# Altium PCB HairColorDispenser.PcbDoc
Units mm, origin at the board's own origin, x right, y up, seen from the top; angles counter-clockwise.
Board outline 93 x 77 mm, 2 copper layers (Top Layer, Bottom Layer), stack 0.325 mm thick; 86 components, 76 nets, 303 pads, 70 vias.
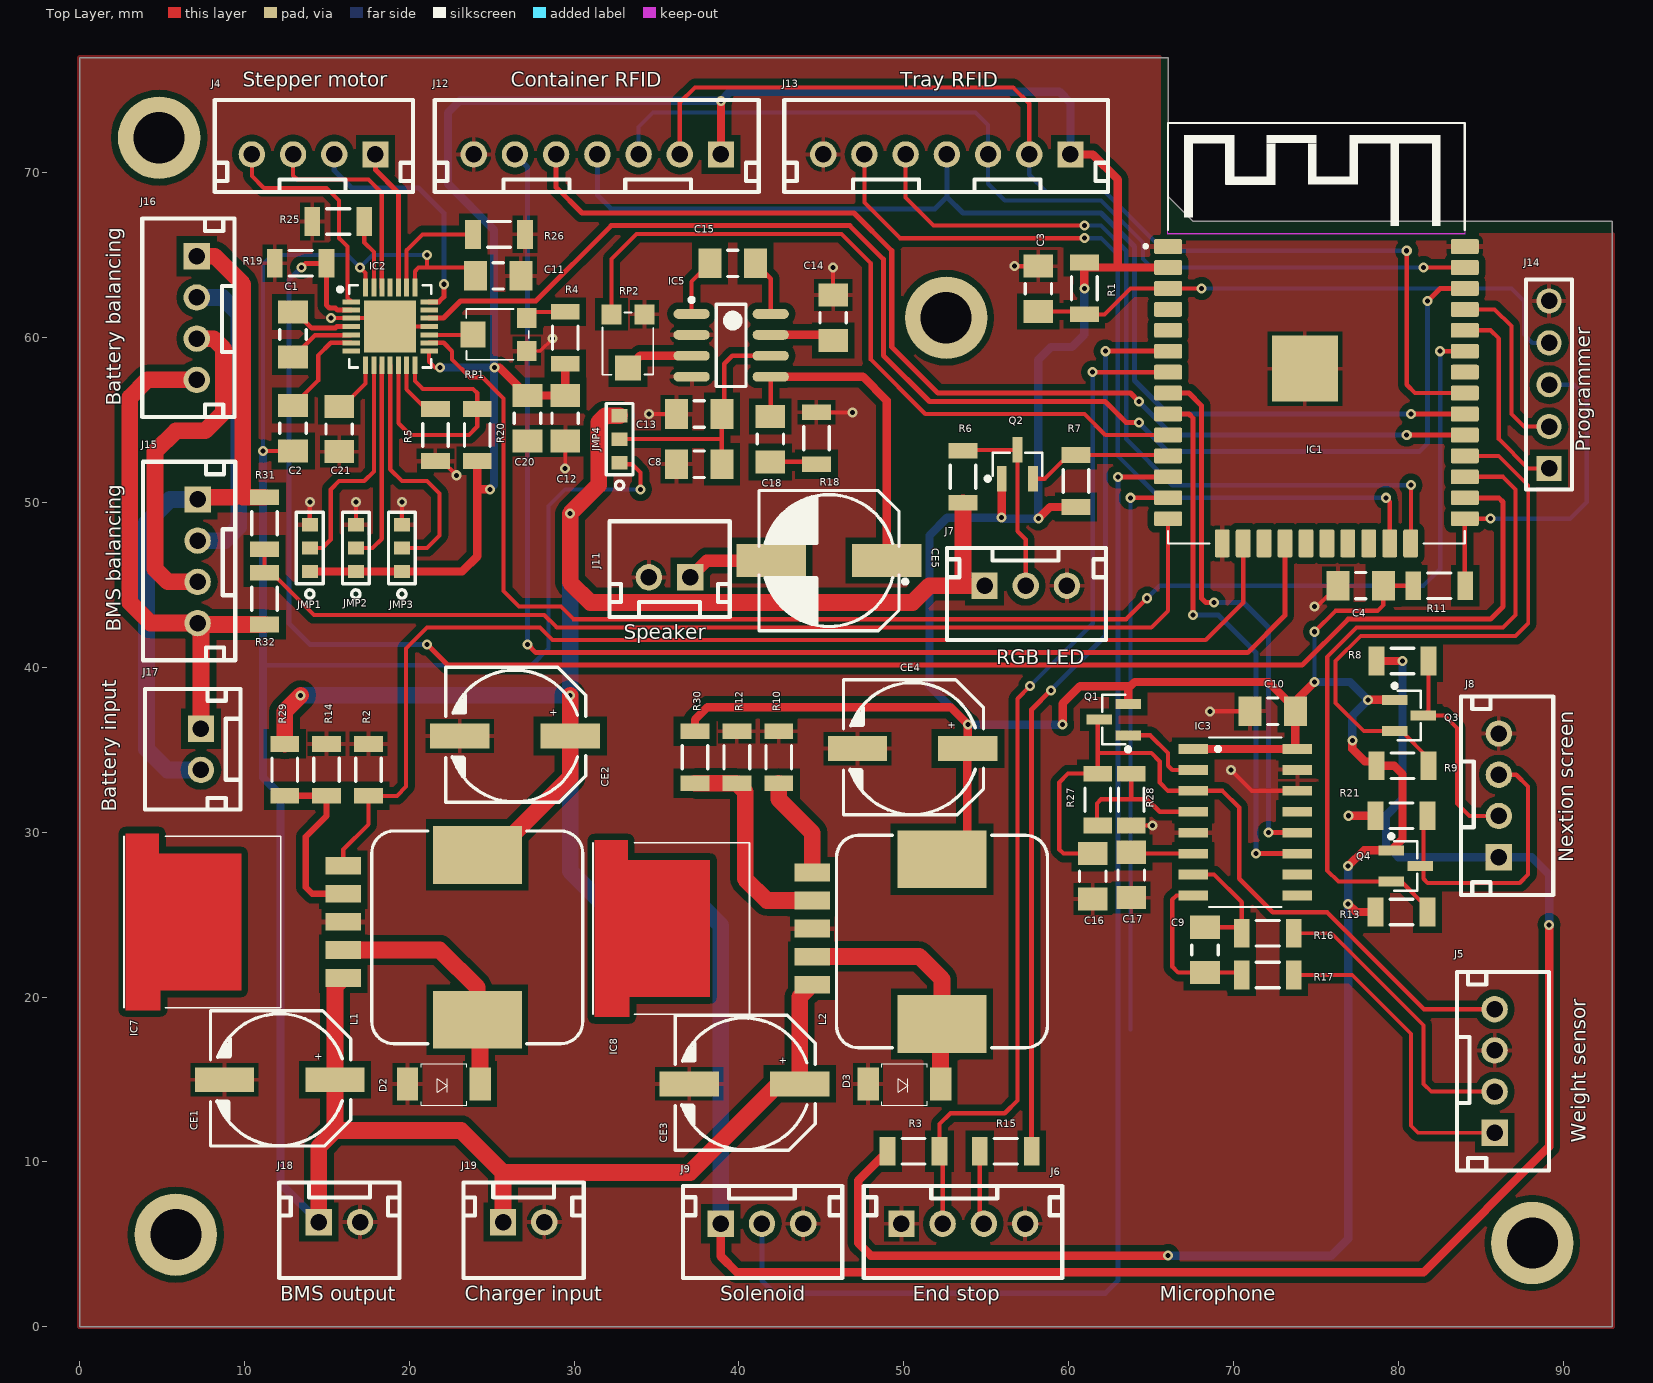
[diagram p0: Top Layer view]
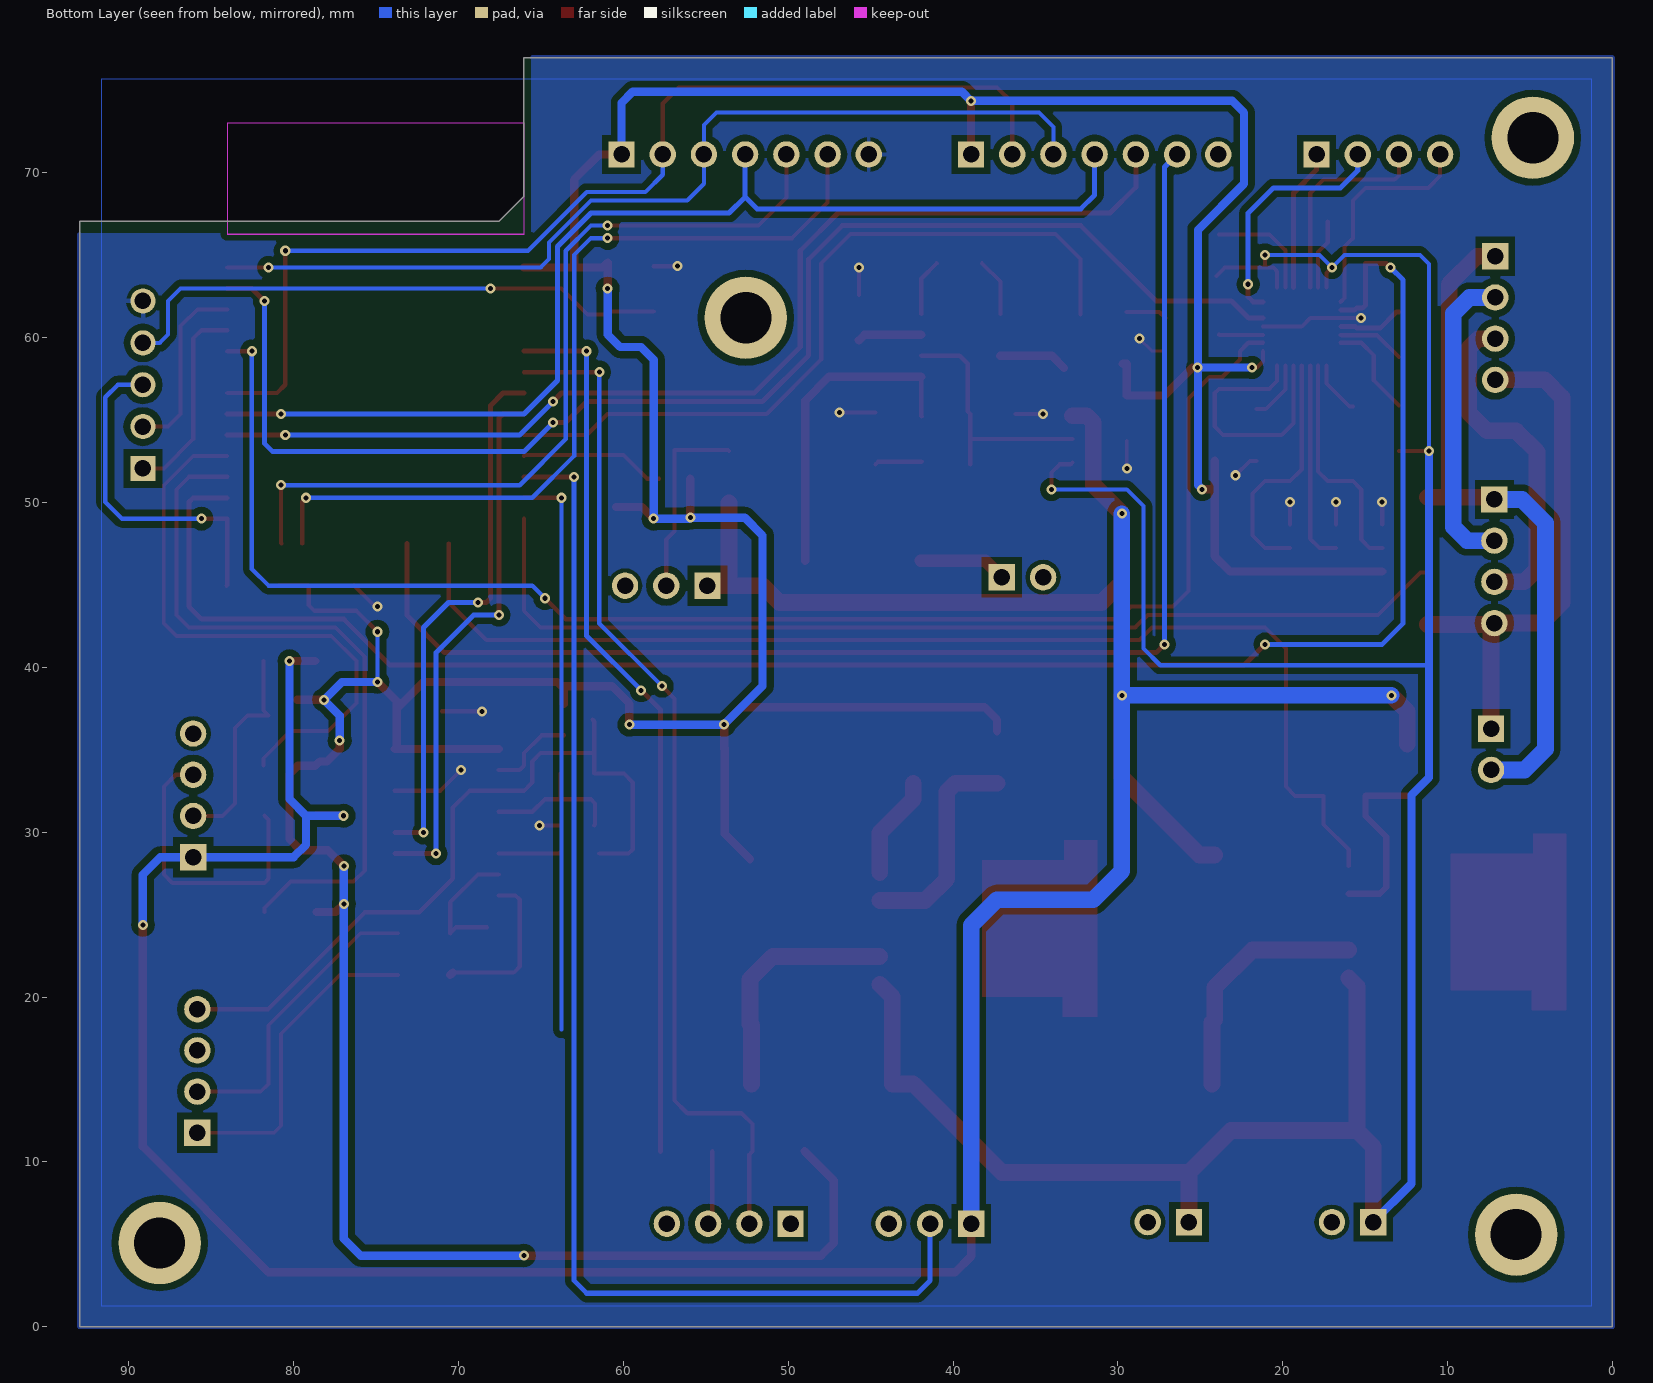
[diagram p1: Bottom Layer view, seen from below]

## Layer stack, top to bottom
Top Solder: solder mask 0.0102, Solder Resist, Dk 3.5
Top Layer: signal copper 0.0356
Dielectric 1: core 0.254, FR-4, Dk 4.2
Bottom Layer: signal copper 0.0356
Solder Side: solder mask 0.0102, Solder Resist, Dk 3.5

## Board outline
0,0 93,0 93,67.056 67.564,67.056 66.04,68.58 66.04,77 0,77

## Design rules (kind name [scope] priority, off if disabled: settings)
Clearance Clearance_1 [InComponent('IC2')] p1: gap=0.152 ignorepadtopadclearanceinfootprint=FALSE except(0: Arc-Hole Track-Hole SMDPad-Hole THPad-Hole Via-Hole Fill-Hole Poly-Hole Region-Hole Text-Hole)
Clearance "Clearance Poly" [InPoly] p2: gap=0.406 ignorepadtopadclearanceinfootprint=FALSE except(0: Arc-Hole Track-Hole SMDPad-Hole THPad-Hole Via-Hole Fill-Hole Poly-Hole Region-Hole Text-Hole)
Clearance [All] p3: gap=0.152 ignorepadtopadclearanceinfootprint=FALSE except(0: Arc-Hole Track-Hole SMDPad-Hole THPad-Hole Via-Hole Fill-Hole Poly-Hole Region-Hole Text-Hole)
DiffPairsRouting [All] p1: maxlimit=0.254 minlimit=0.254 mostfreqgap=0.254 toplayer_minwidth=0.254 toplayer_maxwidth=0.254 toplayer_prefwidth=0.254 bottomlayer_minwidth=0.254 bottomlayer_maxwidth=0.254 bottomlayer_prefwidth=0.254 maxuncoupledlength=12.7
HoleSize [All] p1: absolutevalues=TRUE maxlimit=12.7 minlimit=0.025 maxpercent=80.000 minpercent=20.000
MinimumSolderMaskSliver [All] p1: minsoldermaskwidth=0.025
PolygonConnect PolygonConnect_Via [IsVia] p1: connectstyle=Direct reliefconductorwidth=0.254 reliefentries=4 polygonreliefangle="90 Angle" airgapwidth=0.254
PolygonConnect [All] p2: connectstyle=Relief reliefconductorwidth=0.254 reliefentries=4 polygonreliefangle="90 Angle" airgapwidth=0.254
RoomDefinition HairColorDispenser [InComponentClass('HairColorDispenser')] p1: confinementstyle=ConfineIn formatcopy=TRUE lockcomponents=FALSE outline -598.755,-621.56 -547.955,-621.56 -547.955,-596.16 -598.755,-596.16
RoutingVias [All] p1: holewidth=0.254 width=0.508 viastyle="Through Hole" minholewidth=0.305 minwidth=0.61 maxholewidth=2.54 maxwidth=2.54
SilkToSilkClearance [All] p1: silktosilkclearance=0.127
SilkToSolderMaskClearance [IsPad] p1: minsilkscreentomaskgap=0.127 clearancetoexposedcopper=TRUE
SolderMaskExpansion [All] p1: expansion=0.102
Width [All] p1: maxlimit=2.032 minlimit=0.152 preferedwidth=0.254
25 further rules are at their usual default settings.

## Components (designator, comment, footprint, x,y, rotation, side; value= is the part's Value field where it differs from the comment)
C1 "100n" CAPC3216X18N 12.954,60.198 r270 top
C2 "100n" CAPC3216X18N 12.954,54.505 r270 top
C3 "100n" CAPC3216X18N 58.166,62.967 r270 top
C4 "100n" CAPC3216X18N 77.724,44.958 r0 top
C8 "100n" CAPC3216X18N 37.592,52.324 r0 top
C9 "100n" CAPC3216X18N 68.275,22.86 r90 top
C10 "100n" CAPC3216X18N 72.39,37.338 r0 top
C11 "100n" CAPC3216X18N 25.4,63.754 r180 top
C12 "100n" CAPC3216X18N 29.464,55.118 r90 top
C13 "10uF" CAPC3216X18N 37.592,55.372 r0 top
C14 "10uF" CAPC3216X18N 45.72,61.214 r270 top
C15 "10uF" CAPC3216X18N 39.624,64.516 r0 top
C16 "1uF" CAPC3216X18N 61.468,27.327 r90 top
C17 "1uF" CAPC3216X18N 63.804,27.41 r90 top
C18 "10p" CAPC3216X18N 41.91,53.848 r270 top
C20 "2u2" CAPC3216X18N 27.178,55.118 r90 top
C21 "220n" CAPC3216X18N 15.748,54.461 r90 top
CE1 "220uF" "220uF 35V" 12.144,14.961 r0 top
CE2 "220uF" "220uF 35V" 26.416,35.814 r0 top
CE3 "220uF" "220uF 35V" 40.338,14.707 r0 top
CE4 "220uF" "220uF 35V" 50.546,35.052 r0 top
CE5 "100u 25V" CAPAE800X550N 45.466,46.482 r180 top
D2 "1N5824" SOD128 22.098,14.732 r180 top
D3 "1N5824" SOD128 50.038,14.732 r180 top
IC1 "ESP32-WROOM-32" MODULE_ESP-WROOM-32 75.04,57.277 r0 top
IC2 "A4988" "28-QFN (5x5)" 18.846,60.684 r0 top
IC3 "HX711" SOP16 70.719,30.988 r0 top
IC5 "LM386" SOIC-8 39.534,59.541 r0 top
IC7 "LM2596 Adj" TO263-5 16.002,21.16 r90 top
IC8 "LM2596 Adj" TO263-5 44.447,20.756 r90 top
J4 "Stepper motor" B4B-HX-A 17.954,71.12 r180 top
J5 "Weight Sensor" B4B-HX-A 85.852,11.764 r90 top
J6 "QRD1114" B4B-HX-A 49.864,6.252 r0 top
J7 "WS2812B" B3B-HX-A 54.904,44.958 r0 top
J8 "Nextion" B4B-HX-A 86.106,28.488 r90 top
J9 "WS2812B" B3B-HX-A 38.902,6.252 r0 top
J11 "Speaker" B2B-XH-A 37.044,45.466 r180 top
J12 "RFID Container" B7B-HX-A 38.916,71.12 r180 top
J13 "RFID Tray" B7B-HX-A 60.118,71.12 r180 top
J14 "Programmer" HEADER1X5 89.154,55.88 r90 top
J15 "Balancing BMS" B4B-HX-A 7.162,50.19 r270 top
J16 "Balancing Battery" B4B-HX-A 7.112,64.944 r270 top
J17 "Battery Input" B2B-XH-A 7.366,36.282 r270 top
J18 "BMS Output" B2B-XH-A 14.518,6.35 r0 top
J19 "Charger Input" B2B-XH-A 25.694,6.35 r0 top
JMP1 "0R" JMP_SOLDER_3 13.97,47.244 r90 top
JMP2 "0R" JMP_SOLDER_3 16.764,47.244 r90 top
JMP3 "0R" JMP_SOLDER_3 19.558,47.244 r90 top
JMP4 "0R" JMP_SOLDER_3 32.766,53.848 r90 top
L1 "33uH 3A" "33uH 3A" 24.13,23.622 r90 top
L2 "33uH 3A" "33uH 3A" 52.324,23.368 r90 top
Q1 "MMBT4403" SOT95P230X126-3N 62.738,36.83 r180 top
Q2 "2N7002" SOT95P230X126-3N 56.896,52.324 r90 top
Q3 "2N7002" SOT95P230X126-3N 80.659,37.084 r0 top
Q4 "2N7002" SOT95P230X126-3N 80.456,27.953 r0 top
R1 "10K" "SMD 1206" 60.96,62.992 r90 top
R2 "10K" "SMD 1206" 17.526,33.782 r270 top
R3 "10K" "SMD 1206" 50.596,10.646 r180 top
R4 "10K" "SMD 1206" 29.464,59.995 r270 top
R5 "10K" "SMD 1206" 21.59,54.102 r90 top
R6 "10K" "SMD 1206" 53.594,51.562 r90 top
R7 "10K" "SMD 1206" 60.452,51.308 r270 top
R8 "10K" "SMD 1206" 80.264,40.386 r0 top
R9 "10K" "SMD 1206" 80.264,34.036 r180 top
R10 "10K" "SMD 1206" 42.418,34.544 r270 top
R11 "10K" "SMD 1206" 82.499,44.958 r0 top
R12 "1K" "SMD 1206" 39.878,34.544 r270 top
R13 "10K" "SMD 1206" 80.202,25.159 r180 top
R14 "1K" "SMD 1206" 14.986,33.782 r270 top
R15 "100R" "SMD 1206" 56.184,10.646 r180 top
R16 "100R" "SMD 1206" 72.085,23.876 r180 top
R17 "100R" "SMD 1206" 72.085,21.336 r180 top
R18 "100R" "SMD 1206" 44.704,53.899 r90 top
R19 "100K" "SMD 1206" 13.411,64.516 r180 top
R20 "100K" "SMD 1206" 24.13,54.102 r270 top
R21 "10K" "SMD 1206" 80.202,31.001 r0 top
R25 "0R05" "SMD 1206" 15.697,67.056 r180 top
R26 "0R05" "SMD 1206" 25.45,66.272 r0 top
R27 "20K" "SMD 1206" 61.772,31.982 r270 top
R28 "8.2K" "SMD 1206" 63.804,31.982 r90 top
R29 "3.09K" "SMD 1206" 12.446,33.782 r270 top
R30 "1.69K" "SMD 1206" 37.338,34.544 r270 top
R31 "33K" "SMD 1206" 11.226,48.746 r90 top
R32 "10K" "SMD 1206" 11.226,44.174 r90 top
RP1 "10K" "SMD POT" 27.126,59.198 r90 top
RP2 "10K" "SMD POT" 34.274,61.416 r180 top

## Footprints (in the part's own frame and the unit in brackets; to place one, negate y for a bottom-side part, rotate by r counter-clockwise, add the part's x,y. Pads: shape width x height; smd on the part's side, far side on the other; paste and mask are expansions set on the pad)
"28-QFN (5x5)" [mil] "28-VFQFN Exposed Pad (5x5)"
  rect 42x12 smd: 1(-93,59) 2(-93,39) 3(-93,20) 4(-93,0) 5(-93,-20) 6(-93,-39) 7(-93,-59) 15(93,-59) 16(93,-39) 17(93,-20) 18(93,0) 19(93,20) 20(93,39) 21(93,59)
  rect 12x42 smd: 8(-59,-93) 9(-39,-93) 10(-20,-93) 11(0,-93) 12(20,-93) 13(39,-93) 14(59,-93) 22(59,93) 23(39,93) 24(20,93) 25(0,93) 26(-20,93) 27(-39,93) 28(-59,93)
  rect 124x124 smd: 29(0,0)
  silkscreen extent -124,-98 98,98, body extent -98,-98 98,98, height 39
"33uH 3A" [mm] "Precision Wire Wound Inductor, 2-Leads, Body 12.5x12.5mm, IPC Low Density"
  rect 3.5x5.4 smd: 1(-5,0) 2(5,0)
  silkscreen extent -6.45,-6.4 6.45,6.4, body extent -6.25,-6.25 6.25,6.25, height 7.5
"220uF 35V" [mm] "Molded Capacitor, 2-Leads, Body 8x10mm, IPC Medium Density"
  rect 3.6x1.5 smd: 1(3.35,0.025) 2(-3.35,0.025)
  silkscreen extent -4.2,-4 4.3,4.2, body extent -4,-3.97 4,4.03, height 10
B2B-XH-A [mm]
  rect 1.6x1.6 hole 1: 1(0,0)
  round 1.6 hole 1: 2(2.5,0)
  silkscreen extent -2.4,-3.4 4.9,2.4, body extent -2.45,-3.38 4.95,2.37, height 7
B3B-HX-A [mm] "HEADER, TOP ENTRY, 3WAY, 2MM"
  rect 1.6x1.6 hole 1: 1(0,0)
  round 1.6 hole 1: 2(2.5,0) 3(5,0)
  silkscreen extent -2.29,-3.3 7.37,2.29, body extent -2.41,-3.38 7.49,2.37, height 7
B4B-HX-A [mm] "HEADER, TOP ENTRY, 4WAY, 2MM"
  rect 1.6x1.6 hole 1: 1(0,0)
  round 1.6 hole 1: 2(2.5,0) 3(5,0) 4(7.5,0)
  silkscreen extent -2.29,-3.3 9.75,2.29, body extent -2.44,-3.31 9.96,2.44, height 7
B7B-HX-A [mm] "HEADER, TOP ENTRY, 4WAY, 2MM"
  rect 1.6x1.6 hole 1: 1(0,0)
  round 1.6 hole 1: 2(2.5,0) 3(5,0) 4(7.5,0) 5(10,0) 6(12.5,0) 7(15,0)
  silkscreen extent -2.29,-3.3 17.37,2.29, body extent -2.4,-3.4 17.49,2.37, height 7
CAPAE800X550N [mm] "Molded Capacitor, 2-Leads, Body 8.3x8.3mm, IPC Medium Density"
  rect 4.2x2 smd: 1(-3.5,0) 2(3.5,0)
  silkscreen extent -4.75,-4.25 4.25,4.25, body extent -4.02,-3.99 3.98,4.01, height 5.5
CAPC3216X18N [mm] "Chip Capacitor, 2-Leads, Body 3.20x1.60mm, IPC Medium Density"
  rect 1.4x1.8 smd: 1(-1.375,0) 2(1.375,0)
  silkscreen extent -0.3,-0.8 0.3,0.8, body extent -1.68,-0.87 1.67,0.87, height 1.8
HEADER1X5 [mil]
  rect 60x60 hole 39.37: 1(-150,0)
  round 60 hole 39.37: 2(-50,0) 3(50,0) 4(150,0) 5(250,0)
  silkscreen extent -200,-55 302,55, body extent -200,-50 300,50, height 286
JMP_SOLDER_3 [mil] "3 X 0603"
  rect 32x38 smd: 1(-56,0) 2(0,0)
  rect 32x38 smd paste+0 mask+0: 3(56,0)
  silkscreen extent -120,-32 85,32, body extent -72,-19 16,19, height 24
MODULE_ESP-WROOM-32 [mm]
  rrect22% 1.7x0.9 smd: 1(-9,8.255) 2(-9,6.985) 3(-9,5.715) 4(-9,4.445) 5(-9,3.175) 6(-9,1.905) 7(-9,0.635) 8(-9,-0.635) 9(-9,-1.905) 10(-9,-3.175) 11(-9,-4.445) 12(-9,-5.715) 13(-9,-6.985) 14(-9,-8.255) 25(9,-8.255) 26(9,-6.985) 27(9,-5.715) 28(9,-4.445) 29(9,-3.175) 30(9,-1.905) 31(9,-0.635) 32(9,0.635) 33(9,1.905) 34(9,3.175) 35(9,4.445) 36(9,5.715) 37(9,6.985) 38(9,8.255)
  rect 4x4 smd: 1.1(-0.7,0.845)
  rrect22% 0.9x1.7 smd: 15(-5.715,-9.755) 16(-4.445,-9.755) 17(-3.175,-9.755) 18(-1.905,-9.755) 19(-0.635,-9.755) 20(0.635,-9.755) 21(1.905,-9.755) 22(3.175,-9.755) 23(4.445,-9.755) 24(5.715,-9.755)
  Keep-Out Layer region: 9,9.026 -9.026,9.026 -9.026,15.75 9,15.75
  Keep-Out Layer region: 9,9.012 -9.012,9.012 -9.012,15.75 9,15.75
  Keep-Out Layer region: 9,9.024 -9.024,9.024 -9.024,15.75 9,15.75
  silkscreen extent -10.46,-9.75 9,15.75, body extent -9.05,-9.8 9.02,15.74, height 3
"SMD 1206" [mm]
  rect 0.95x1.75 smd: 1(-1.575,0) 2(1.575,0)
  silkscreen extent -0.7,-0.77 0.7,0.77, body extent -1.6,-0.85 1.6,0.85, height 0.55
"SMD POT" [mm]
  rect 1.2x1.2 smd: 1(0,0) 3(2,0)
  rect 1.6x1.5 smd: 2(1,3.25)
  silkscreen extent -0.54,-0.12 2.55,3.66, body extent -0.54,-0.13 2.56,3.65, height 1.01
SOD128 [mm] "SOD128"
  rect 1.3x2 smd: 1(-2.2,0) 2(2.2,0)
  silkscreen extent -1.39,-1.22 1.38,1.3, body extent -2.45,-1.35 2.55,1.35, height 1.1
SOIC-8 [mm] "SOIC, 8-Leads, Body 5.0x4.0mm (max), Pitch 1.27mm, IPC Medium Density"
  oval 2.2x0.6 smd: 1(-2.4,1.905) 2(-2.4,0.635) 3(-2.4,-0.635) 4(-2.4,-1.905) 5(2.4,-1.905) 6(2.4,-0.635) 7(2.4,0.635) 8(2.4,1.905)
  silkscreen extent -2.52,-2.5 0.9,2.88, body extent -2,-2.5 2,2.5, height 1.75
SOP16 [mm] "SOIC, 8-Leads, Body 5.0x4.0mm (max), Pitch 1.27mm, IPC Medium Density"
  rect 1.8x0.59 smd: 1(-3.155,4.064) 2(-3.155,2.794) 3(-3.155,1.524) 4(-3.155,0.254) 5(-3.155,-1.016) 6(-3.155,-2.286) 7(-3.155,-3.556) 8(-3.155,-4.826) 9(3.155,-4.826) 10(3.155,-3.556) 11(3.155,-2.286) 12(3.155,-1.016) 13(3.155,0.254) 14(3.155,1.524) 15(3.155,2.794) 16(3.155,4.064)
  silkscreen extent -2.2,-5.53 2.2,4.77, body extent -3.96,-5.48 3.96,4.72, height 1.8
SOT95P230X126-3N [mm] "SOT23, 3-Leads, Body 3.0x2.5mm (max), Pitch 0.95mm, IPC Medium Density"
  rect 1.55x0.6 smd: 1(-0.875,0.95) 2(-0.875,-0.95) 3(0.875,0)
  silkscreen extent -1,-1.5 0.7,1.92, body extent -1.33,-1.48 1.23,1.44, height 1.07
TO263-5 [mm]
  rect 1.07x2.17 smd: 1(0,0) 2(1.7,0) 3(3.4,0) 4(5.1,0) 5(6.8,0)
  Top Layer region: -0.75,11.1 -0.75,6.2 7.55,6.2 7.55,11.2 8.75,11.2 8.75,13.2 -1.95,13.2 -1.95,11.1
  silkscreen extent -1.8,3.8 8.6,13.3, body extent -1.72,-0.82 8.5,13.22, height 4.38

## Part data
C1 C2: library part "100n 25V NP0", "CAP CER 0.1UF 25V NP0 1206", Manufacturer="Murata Electronics North America", Manufacturer Code=GRM31C5C1E104JA01L, Distributor=Digi-Key, Ordering Code=490-1767-1-ND
C3 C4 C8 C9 C10 C11 C12: library part "100n 50V X7R", "CAP CER 0.1UF 50V X7R 1206", Manufacturer=KEMET, Manufacturer Code=C1206C104K5RAC7800, Distributor=Digi-Key, Ordering Code=399-C1206C104K5RAC7800CT-ND
C13 C14 C15: library part "10uF 25V X7R", "CAP CER 10UF 25V X5R 1206", Manufacturer=KEMET, Manufacturer Code=C1206C106M3PACTU, Distributor=Digi-Key, Ordering Code=399-8153-1-ND
C16 C17: library part "1uF 25V X7R", "CAP CER 1UF 25V X7R 1206", Manufacturer=KEMET, Manufacturer Code=C1206C105M3RACTU, Distributor=Digi-Key, Ordering Code=399-8148-1-ND
C18: library part "10p 50V X7R", "CAP CER 10pF 50V NP0 1206", Manufacturer=KEMET, Manufacturer Code=C1206C100J5GACAUTO, Distributor=Digi-Key, Ordering Code=399-C1206C100J5GACAUTOCT-ND
C20: library part "2u2 50V X7R", "CAP CER 2.2UF 50V X7R 1206", Manufacturer=KEMET, Manufacturer Code=C1206C225K5RACAUTO, Distributor=Digi-Key, Ordering Code=399-7019-1-ND
C21: library part "220n 50V X7R", "CAP CER 0.22UF 50V X7R 1206", Manufacturer=KEMET, Manufacturer Code=C1206C224K5RACTU, Distributor=Digi-Key, Ordering Code=399-1251-1-ND
CE1 CE2 CE3 CE4: library part "220u 35V", "CAP ALUM 220UF 20% 35V SMD", Manufacturer=Nichicon, Manufacturer Code=UWT1V221MNL1GS, Distributor=Digi-Key, Ordering Code=493-2205-1-ND
CE5: library part "100u 25V h=5.4mm", "CAPAE800X700 CASE E PANASONIC_EEEFK1E101P", Manufacturer=Nichicon, Manufacturer Code=UWX1E101MCL1GB, Distributor=Digi-Key, Ordering Code=493-2113-1-ND
D2 D3: "DIODE SCHOTTKY 30V 5A MFLAT", Manufacturer="Toshiba Semiconductor and Storage", Manufacturer Code=CMS04(TE12L,Q,M), Distributor=Digi-Key, Ordering Code=1N5819HW-FDICT-ND
IC1: "Bluetooth, WiFi Transceiver Module 2.4GHz ~ 2.5GHz Surface Mount", Manufacturer="Espressif Systems", Distributor=DigiKey, Manufacturer Code=ESP32-WROOM-32, Ordering Code=1904-1010-1-ND
IC2: "IC MTR DRVR BIPOLAR 3-5.5V 28QFN", Manufacturer="Allegro MicroSystems", Manufacturer Code=A4988SETTR-T, Distributor=DigiKey, Ordering Code=620-1343-1-ND
IC3: "LOAD CELL AMP HX711", Distributor=AliExpress, Manufacturer Code=HX711
IC5: "IC AMP AUDIO PWR .325W AB 8SOIC", Manufacturer="Texas Instruments", Manufacturer Code=LM386MX-1/NOPB, Distributor=Digi-Key, Ordering Code=LM386MX-1/NOPBCT-ND
IC7 IC8: "IC REG MULT CONFG ADJ 3A D2PAK-5", Manufacturer="ON Semiconductor", Manufacturer Code=LM2596DSADJG, Distributor=Digi-Key, Ordering Code=LM2596DSADJGOS-ND
J4 J5 J6 J8 J15 J16: library part "JST 4-Pin 2.5mm B4B-XH-A", "CONN HEADER XH TOP 2POS 2.5MM", Manufacturer="JST Sales America Inc.", Manufacturer Code=B4B-XH-A(LF)(SN), Distributor=Digi-Key, Order Code=455-2249-ND
J7 J9: library part "JST 3-Pin 2.5mm B3B-XH-A", "CONN HEADER XH TOP 2POS 2.5MM", Manufacturer="JST Sales America Inc.", Manufacturer Code=B3B-XH-A(LF)(SN), Distributor=Digi-Key, Order Code=455-2248-ND
J11 J17 J18 J19: library part "JST 2-Pin 2.5mm B2B-XH-A", "CONN HEADER XH TOP 2POS 2.5MM", Manufacturer="JST Sales America Inc.", Manufacturer Code=B2B-XH-A(LF)(SN), Distributor=Digi-Key, Order Code=455-2247-ND
J12 J13: library part "JST 7-Pin 2.5mm B7B-XH-A", "CONN HEADER VERT 7POS 2.5MM", Manufacturer="JST Sales America Inc.", Manufacturer Code=B7B-XH-A(LF)(SN), Distributor=Digi-Key, Order Code=455-2252-ND
J14: library part "Header 1x5", "CONN HEADER VERT 5POS 2.54MM", Manufacturer="Harwin Inc.", Manufacturer Code=M20-9990546, Distributor=Digi-Key, Ordering Code=952-2268-ND
JMP1 JMP2 JMP3 JMP4: library part "JMP-3 0R0 0603", "Solder Jumper 3x0603"
L1 L2: library part "IND 33u 3A", "FIXED IND 33UH 3A 60 MOHM SMD", Manufacturer="Bourns Inc.", Manufacturer Code=SRR1260-330M, Distributor=Digi-Key, Ordering Code=SRR1260-330MTR-ND
Q1: "PNP 40V 600mA 200MHz 300mW SOT-23-3", Manufacturer="ON Semiconductor", Manufacturer Code=MMBT4403LT1G, Distributor=Digi-Key, Ordering Code=MMBT4403LT1GOSCT-ND
Q2 Q3 Q4: "MOSFET N-CH 60V 115mA SOT-23", Manufacturer="ON Semiconductor", Distributor=Digi-Key, Manufacturer Code=2N7002, Ordering Code=2N7002NCT-ND
R1 R2 R3 R4 R5 R6 R7 R8 R9 R10 R11 R13 R21 R32: library part "10K 1% 0.25W", "RES SMD 10K OHM 1% 1/4W 1206", Manufacturer=Yageo, Manufacturer Code=RC1206FR-0710KL, Distributor=Digi-Key, Ordering Code=311-10.0KFRCT-ND
R12 R14: library part "1K 1% 0.25W", "RES SMD 1K OHM 1% 1/4W 1206", Manufacturer=Yageo, Manufacturer Code=RC1206FR-071KL, Distributor=Farnell, Ordering Code=311-1.00KFRCT-ND
R15 R16 R17 R18: library part "100R 1% 0.25W", "RES SMD 100 OHM 1% 1/4W 1206", Manufacturer=Yageo, Manufacturer Code=RC1206FR-07100RL, Distributor=Digi-Key, Ordering Code=311-100FRCT-ND
R19 R20: library part "100K 1% 0.25W", "RES SMD 100K OHM 1% 1/4W 1206", Manufacturer=Yageo, Manufacturer Code=RC1206FR-07100KL, Distributor=Digi-Key, Ordering Code=311-100KFRCT-ND
R25 R26: library part "0R05 0.5% 0.5W", "RES 50M OHM 0.5% 1/2W 1206", Manufacturer=Ohmite, Manufacturer Code=KDV12DR050ET, Distributor=Digi-Key, Order Code=273-KDV12DR050ETCT-ND
R27: library part "20K 1% 0.25W", "RES SMD 20K OHM 1% 1/4W 1206", Manufacturer=Yageo, Manufacturer Code=RC1206FR-0720KL, Distributor=Digi-Key, Ordering Code=311-20.0KFRCT-ND
R28: library part "8K2 1% 0.25W", "RES SMD 8.2K OHM 5% 1/4W 1206", Manufacturer=Yageo, Manufacturer Code=RC1206JR-078K2L, Distributor=Digi-Key, Ordering Code=311-8.2KERCT-ND
R29: library part "3.09K 1% 0.25W", "RES SMD 3.09K OHM 1% 0.25W 1206", Manufacturer=Yageo, Manufacturer Code=RC1206FR-073K09L, Distributor=Digi-Key, Order Code=311-3.09KFRCT-ND
R30: library part "1.69K 1% 0.25W_1", "RES SMD 1.69K OHM 1% 0.25W 1206", Manufacturer=Yageo, Manufacturer Code=RC1206FR-071K69L, Distributor=Digi-Key, Order Code=311-1.69KFRCT-ND
R31: library part "33K 1% 0.25W", "RESISTOR, POWER, 1206, 1%, 33K", Manufacturer=Yageo, Manufacturer Code=RC1206FR-0733KL, Distributor=Digi-Key, Ordering Code=311-33.0KFRCT-ND
RP1 RP2: library part "10k POT SMD", "TRIMMER 10K OHM 0.1W SMD", Manufacturer="Bourns Inc.", Manufacturer Code=TC33X-2-103E, Distributor=Digi-Key, Ordering Code=TC33X-103ECT-ND

## Free pads (board coordinates)
  round 5 hole 3.1: 0(4.826,72.136) 0(5.842,5.588) 0(52.578,61.214) 0(88.138,5.08)

## Via types
v1: diameter 0.61, hole 0.305, Top Layer to Bottom Layer, 70 vias

## Nets (pads, with @x,y where several pads share a name; then routed paths per layer and width w, separated by ;. In a path a pad name is that pad's centre, name@x,y a point inside that pad or via, vN(x,y) a via of type N, cw(c..) or ccw(c..) an arc to the next point about the centre after c; other vN are vias at no path point)
3V3: C4.2 C10.2 C12.2 C20.2 CE4.1 IC1.2 IC2.15 IC3.1 IC3.16 J12.1 J13.1 JMP1.1 JMP2.1 JMP3.1 L2.2 Q1.2 Q2.1 Q3.1 Q4.1 R1.2 R3.2 R4.2 R7.2 R9.2 R11.1 R13.2 R20.2 R30.1 | length 307.5
  Top Layer w0.254: IC2.15 21.208,58.548 21.565,58.191 v1(21.869,58.191) ; v1(74.93,42.164) 76.2,43.434 78.74,43.434 79.099,43.793 C4.2 R11.1
  Top Layer w0.508: JMP1.1 JMP2.1 JMP3.1 23.216,45.822 24.13,46.736 24.13,50.8 ; R20.2 24.13,50.8 ; v1(24.892,50.8) 24.13,50.8 ; v1(25.171,58.191) 25.48,58.191 C20.2 C12.2 R4.2 R4.2@29.718,58.42 ; R30.1 37.338,36.83 38.1,37.592 52.832,37.592 v1(53.896,36.528) CE4.1 53.848,35.125 53.848,29.892 L2.2 ; J12.1 v1(38.916,74.368) ; R3.2 47.244,8.869 47.244,5.08 48.006,4.318 v1(66.04,4.318) ; v1(55.946,49.088) Q2.1 ; v1(58.166,49.022) 58.877,49.733 R7.2 ; v1(59.642,36.528) 59.642,37.798 60.706,38.862 63.754,38.862 ; J13.1 61.468,71.12 62.992,69.596 62.992,64.262 ; v1(60.96,62.992) R1.2 61.265,64.262 62.992,64.262 ; Q1.2 63.613,38.721 63.754,38.862 ; IC1.2 62.992,64.262 ; IC3.1 IC3.16 ; C10.2@73.66,37.592 72.136,39.116 64.008,39.116 63.754,38.862 ; IC3.16@73.765,35.161 C10.2 73.765,37.951 v1(74.93,39.116) ; v1(76.962,25.654) 77.457,25.159 R13.2 ; v1(76.962,27.94) 77.925,28.903 Q4.1 80.264,29.586 80.264,33.528 79.756,34.036 R9.2 78.435,34.29 77.978,34.29 77.216,35.052 v1(77.216,35.56) ; v1(78.166,38.034) Q3.1
  Bottom Layer w0.254: v1(74.93,39.116) v1(74.93,42.164)
  Bottom Layer w0.508: v1(21.869,58.191) v1@25.146,58.191 ; v1(24.892,50.8) 25.146,51.054 v1@25.146,58.191 ; v1(25.171,58.191) v1@25.146,58.191 ; v1(59.642,36.528) v1(53.896,36.528) 51.562,38.862 51.562,48.006 52.644,49.088 v1(55.946,49.088) 56.012,49.022 v1(58.166,49.022) 58.166,58.674 58.928,59.436 60.198,59.436 60.96,60.198 v1(60.96,62.992) ; J13.1 60.118,74.248 59.436,74.93 39.478,74.93 v1(38.916,74.368) 23.06,74.368 22.352,73.66 22.352,69.342 25.146,66.548 v1@25.146,58.191 ; v1(66.04,4.318) 75.946,4.318 76.962,5.334 v1(76.962,25.654) v1(76.962,27.94) ; v1(74.93,39.116) 77.084,39.116 v1(78.166,38.034) 77.216,37.084 v1(77.216,35.56)
5V: CE2.1 J7.1 J8.1 J9.1 JMP4.3 L1.2 R6.1 R8.1 R21.1 R29.1 | length 225.5
  Top Layer w0.508: J9.1 38.902,4.278 39.878,3.302 81.534,3.302 89.154,10.922 v1(89.154,24.384) ; v1(76.975,31.001) R21.1 ; R8.1 v1(80.264,40.386)
  Top Layer w1.016: R29.1 12.446,37.338 v1(13.414,38.306) ; L1.2 25.066,28.622 29.766,33.322 CE2.1 v1(29.766,38.306) ; JMP4.3 31.902,55.27 31.496,54.864 31.496,51.054 v1(29.766,49.324) 29.766,45.164 30.988,43.942 50.546,43.942 51.562,44.958 53.594,44.958 ; R6.1 53.594,44.958 ; J7.1 53.594,44.958
  Bottom Layer w0.508: v1(76.975,31.001) 79.261,31.001 ; v1(80.264,40.386) 80.264,32.004 79.261,31.001 ; v1(89.154,24.384) 89.154,27.432 88.098,28.488 J8.1 80.01,28.488 79.261,29.237 79.261,31.001
  Bottom Layer w1.016: v1(13.414,38.306) v1(29.766,38.306) ; v1(29.766,49.324) v1(29.766,38.306) ; J9.1 38.902,24.344 37.338,25.908 31.496,25.908 29.766,27.638 v1(29.766,38.306)
12V: C2.2 C11.2 CE1.1 CE3.1 IC2.22 IC2.28 IC7.1 IC8.1 J18.1 J19.1 JMP4.1 | length 170.4
  Top Layer w0.254: v1(11.132,53.13) C2.2 ; v1(17.018,64.262) 17.347,63.933 IC2.28 ; IC2.22 20.345,64.033 20.574,64.262 21.082,64.262 ; v1(21.082,65.024) 21.082,64.262 ; C11.2 23.517,64.262 21.082,64.262 ; JMP4.1 32.868,52.324 33.528,52.324 34.036,51.816 v1(34.036,50.8)
  Top Layer w1.016: J18.1 14.518,10.922 15.494,11.898 ; IC7.1 15.494,20.652 CE1.1 15.494,11.898 ; J19.1 25.694,9.358 ; IC8.1 43.688,19.998 CE3.1 42.418,14.732 37.044,9.358 25.694,9.358 ; 15.494,11.898 23.154,11.898 25.694,9.358
  Bottom Layer w0.254: 11.132,40.132 27.432,40.132 28.448,41.148 28.448,49.784 29.464,50.8 v1(34.036,50.8) ; v1(11.132,53.13) 11.132,64.472 11.684,65.024 16.256,65.024 v1(17.018,64.262) 17.78,65.024 v1(21.082,65.024)
  Bottom Layer w0.508: v1(11.132,53.13) 11.132,40.132 11.132,33.318 12.192,32.258 12.192,8.676 J18.1
B1: J15.3 J16.3 | length 20.9
  Top Layer w1.016: J16.3 8.128,59.944 8.738,59.334 8.738,55.474 7.62,54.356 5.842,54.356 4.572,53.086 4.572,45.974 5.356,45.19 J15.3
B2: J15.2 J16.2 | length 18.7
  Bottom Layer w1.016: J16.2 8.676,62.444 9.652,61.468 9.652,48.514 8.828,47.69 J15.2
B+: J15.1 J16.1 J17.2 R31.2 | length 41.3
  Top Layer w1.016: J16.1 8.208,64.944 9.906,63.246 9.906,50.321 R31.2 ; J15.1 7.293,50.321 9.398,50.321
  Bottom Layer w1.016: J15.1 5.486,50.19 4.064,48.768 4.064,35.052 5.334,33.782 J17.2
B-: J15.4 J16.4 J17.1 R32.1 | length 32
  Top Layer w1.016: J16.4 4.104,57.444 3.048,56.388 3.048,43.942 4.3,42.69 J15.4 J15.4@7.253,42.599 ; J17.1 7.366,42.486 J15.4@7.253,42.599 ; R32.1 J15.4@7.253,42.599
EN: C3.2 IC1.3 J14.4 R1.1 | length 34.3
  Top Layer w0.254: C3.2 60.785,61.592 R1.1 62.179,61.417 63.754,62.992 IC1.3 v1(68.072,62.992)
  Bottom Layer w0.254: v1(68.072,62.992) 86.868,62.992 87.63,62.23 87.63,60.198 88.138,59.69 J14.4
GND: C3.1 C4.1 C8.1 C10.1 C11.1 C12.1 C13.1 C14.1 C16.1 C17.1 C20.1 C21.1 CE1.2 CE2.2 CE3.2 CE4.2 D2.2 D3.2 IC1.1 IC1.1.1 IC1.15 IC1.38 IC2.3 IC2.18 IC2.29 IC3.5 IC3.14 IC3.15 IC5.2 IC5.4 IC7.3 IC8.3 J5.3 J6.1 J6.4 J7.3 J8.4 J9.3 J11.2 J12.7 J13.7 J14.5 J18.2 J19.2 JMP1.3 JMP2.3 JMP3.3 R2.1 R5.1 R10.1 R12.1 R14.1 R18.2 R19.2 R25.2 R26.2 R28.1 RP1.1 RP2.1 | length 32.7
  Top Layer w0.203: RP1.1 27.956,59.198 v1(28.702,59.944) ; v1(29.464,52.07) C12.1
  Top Layer w0.254: JMP1.3 v1(13.97,50.038) ; v1(15.262,61.192) IC2.3 18.338,61.192 IC2.29 IC2.18 ; JMP2.3 v1(16.764,50.038) ; JMP3.3 v1(19.558,50.038) ; R5.1 21.99,52.527 v1(22.86,51.657) ; v1(34.544,55.372) C13.1 ; R18.2 v1(46.888,55.474) ; C14.1 v1(45.72,64.262) ; v1(56.722,64.342) C3.1 ; R28.1 v1(65.097,30.407) ; v1(68.58,37.338) C10.1 ; v1(69.85,33.782) 71.12,32.512 IC3.14 ; v1(74.93,43.688) 75.079,43.688 C4.1
IO0: IC1.25 J14.3 R11.2 | length 20.9
  Top Layer w0.254: R11.2 84.04,44.992 IC1.25 v1(85.598,49.022)
  Bottom Layer w0.254: v1(85.598,49.022) 90.424,49.022 91.44,50.038 91.44,56.388 90.678,57.15 J14.3
IO4: IC1.26 IC2.2 R19.1 | length 112.7
  Top Layer w0.305: v1(13.462,64.262) 13.716,64.516 R19.1 14.986,61.976 15.16,61.802 15.515,61.802 15.642,61.675 IC2.2 ; v1(21.082,41.402) 22.352,40.132 74.168,40.132 76.962,42.926 85.598,42.926 86.36,43.688 86.36,50.038 86.106,50.292 IC1.26
  Bottom Layer w0.305: v1(13.462,64.262) 12.7,63.5 12.7,42.672 13.97,41.402 v1(21.082,41.402)
IO12: IC1.14 R31.1 R32.2 | length 63.6
  Top Layer w0.254: R31.1 R32.2 11.655,45.749 14.224,43.18 28.194,43.18 28.956,42.418 65.024,42.418 66.04,43.434 IC1.14
IO13: IC1.16 IC7.5 R2.2 | length 71.9
  Top Layer w0.254: IC7.5 16.002,28.956 17.526,30.48 R2.2 19.253,32.207 19.812,32.766 19.812,41.148 21.082,42.418 27.94,42.418 28.702,41.656 68.326,41.656 70.595,43.925 IC1.16
IO14: IC1.13 | length 34.5
  Top Layer w0.254: v1(63.754,50.292) IC1.13
  Bottom Layer w0.254: 63.754,18.034 v1(63.754,50.292)
IO21: IC1.33 IC2.16 | length 91.4
  Top Layer w0.254: IC2.16 22.095,59.693 22.606,59.182 22.606,58.674 23.673,57.607 24.435,57.607 25.73,56.312 25.73,44.628 26.67,43.688 29.21,43.688 29.972,42.926 63.5,42.926 v1(64.77,44.196) ; v1(82.55,59.182) IC1.33
  Bottom Layer w0.254: v1(64.77,44.196) 65.532,44.958 81.534,44.958 82.55,45.974 v1(82.55,59.182)
IO22: IC1.36 IC2.19 | length 83.4
  Top Layer w0.305: IC2.19 22.076,61.192 23.114,62.23 27.686,62.23 32.258,66.802 46.736,66.802 48.768,64.77 48.768,58.928 51.562,56.134 62.23,56.134 63.5,54.864 v1(64.262,54.864) ; v1(81.788,62.23) 82.55,62.992 IC1.36
  Bottom Layer w0.305: v1(64.262,54.864) 66.04,53.086 81.28,53.086 81.788,53.594 v1(81.788,62.23)
IO25: IC1.10 RP2.3 | length 46.2
  Top Layer w0.254: RP2.3 32.274,64.786 33.782,66.294 46.228,66.294 48.006,64.516 48.006,58.674 51.308,55.372 60.96,55.372 62.23,54.102 IC1.10
IO26: IC1.11 Q2.2 R7.1 | length 8.8
  Top Layer w0.254: Q2.2 58.561,51.449 59.995,52.883 R7.1 65.989,52.883 IC1.11
IO27: IC1.12 J9.2 | length 77.5
  Top Layer w0.305: v1(62.992,51.562) IC1.12
  Bottom Layer w0.305: J9.2 41.402,2.794 42.164,2.032 62.23,2.032 62.992,2.794 v1(62.992,51.562)
IO32: IC1.8 IC3.12 | length 33
  Top Layer w0.305: IC1.8 67.31,56.642 68.072,55.88 68.072,44.196 68.326,43.942 v1(68.834,43.942) ; v1(72.136,29.972) IC3.12
  Bottom Layer w0.305: v1(68.834,43.942) 70.612,43.942 72.136,42.418 v1(72.136,29.972)
IO33: IC1.9 IC3.11 | length 33
  Top Layer w0.305: IC1.9 67.31,55.372 67.564,55.118 v1(67.564,43.18) ; v1(71.374,28.702) IC3.11
  Bottom Layer w0.305: v1(67.564,43.18) 69.088,43.18 71.374,40.894 v1(71.374,28.702)
IO34: IC1.6 R15.1 | length 54.2
  Top Layer w0.305: R15.1 57.759,37.439 v1(58.928,38.608) ; v1(62.23,59.182) IC1.6
  Bottom Layer w0.305: v1(58.928,38.608) 62.23,41.91 v1(62.23,59.182)
IO35: IC1.7 J6.2 R3.1 | length 62.1
  Top Layer w0.254: J6.2 52.364,10.453 R3.1 52.171,12.293 52.832,12.954 56.134,12.954 56.896,13.716 56.896,38.1 v1(57.658,38.862) ; v1(61.468,57.912) IC1.7
  Bottom Layer w0.254: v1(57.658,38.862) 61.468,42.672 v1(61.468,57.912)
MISO: IC1.31 J12.2 J13.2 | length 66.1
  Top Layer w0.254: J12.2 36.416,74.262 37.338,75.184 56.642,75.184 57.618,74.208 J13.2 ; v1(80.518,65.278) 80.518,57.15 81.026,56.642 IC1.31
  Bottom Layer w0.254: J13.2 57.618,69.89 58.674,68.834 62.23,68.834 65.786,65.278 v1(80.518,65.278)
MOSI: IC1.37 J12.3 J13.3 | length 58.7
  Top Layer w0.254: v1(81.534,64.262) IC1.37
  Bottom Layer w0.254: J12.3 33.916,72.778 34.798,73.66 54.356,73.66 55.118,72.898 J13.3 55.118,69.342 56.134,68.326 61.976,68.326 64.516,65.786 64.516,64.77 65.024,64.262 v1(81.534,64.262)
NetC1_1: C1.1 IC2.4 | length 4
  Top Layer w0.305: C1.1 13.103,61.573 14.094,60.582 15.515,60.582 15.616,60.684 IC2.4
NetC1_2: C1.2 IC2.5 | length 4.1
  Top Layer w0.254: C1.2 14.282,60.151 16.458,60.151 IC2.5
NetC2_1: C2.1 IC2.6 | length 6
  Top Layer w0.254: C2.1 14.478,57.404 14.478,58.928 15.243,59.693 IC2.6
NetC9_1: C9.1 IC3.8 R17.2 | length 9.9
  Top Layer w0.254: IC3.8 66.548,26.162 66.294,25.908 66.294,21.844 66.653,21.485 C9.1 R17.2@70.361,21.485
  Top Layer w0.508: R17.2@70.361,21.485 R17.2
NetC9_2: C9.2 IC3.7 R16.2 | length 7.9
  Top Layer w0.254: IC3.7 68.834,27.432 70.51,25.756 R16.2 70.151,24.235 C9.2
NetC14_2: C14.2 IC5.7 | length 3.9
  Top Layer w0.508: IC5.7 45.383,60.176 C14.2
NetC15_1: C15.1 IC5.1 | length 3.5
  Top Layer w0.254: IC5.1 37.134,63.401 C15.1
NetC15_2: C15.2 IC5.8 | length 3.5
  Top Layer w0.254: C15.2 41.934,63.581 IC5.8
NetC16_2: C16.2 IC3.3 J5.4 Q1.3 R27.1 | length 45.9
  Top Layer w0.254: C16.2 59.69,28.702 59.436,28.956 59.436,33.02 59.973,33.557 R27.1 61.772,34.798 ; Q1.3 61.772,36.739 61.772,34.798 ; J5.4 81.574,19.264 75.692,25.146 72.39,25.146 70.358,27.178 70.358,31.496 69.342,32.512 IC3.3 66.04,32.512 65.532,33.02 65.532,34.29 65.024,34.798 61.772,34.798
NetC17_2: C17.2 IC3.6 | length 3.8
  Top Layer w0.254: C17.2 63.887,28.702 IC3.6
NetC18_1: C18.1 CE5.1 IC5.5 | length 19.8
  Top Layer w0.254: C18.1 41.934,55.247 IC5.5
  Top Layer w0.508: IC5.5 47.52,57.636 48.966,56.19 CE5.1
NetC18_2: C18.2 R18.1 | length 2.9
  Top Layer w0.254: C18.2 44.555,52.473 R18.1
NetC21_2: C21.2 IC2.8 | length 3.3
  Top Layer w0.254: C21.2 15.958,55.836 17.347,57.225 IC2.8
NetCE5_2: CE5.2 J11.1 | length 5.3
  Top Layer w0.762: J11.1 38.06,46.482 CE5.2
NetD2_1: D2.1 IC7.2 L1.1 | length 15
  Top Layer w1.016: IC7.2 21.844,22.86 24.13,20.574 L1.1 24.298,18.454 D2.1
NetD3_1: D3.1 IC8.2 L2.1 | length 14.8
  Top Layer w1.016: IC8.2 50.95,22.456 52.324,21.082 L2.1 52.238,18.282 D3.1
NetIC2_1: IC2.1 J4.4 | length 13.7
  Top Layer w0.254: J4.4 10.454,69.81 11.176,69.088 14.986,69.088 15.748,68.326 15.748,66.04 16.256,65.532 16.256,62.41 IC2.1
NetIC2_9: IC2.9 JMP1.2 | length 14
  Top Layer w0.254: JMP1.2 14.732,47.244 15.24,47.752 15.24,50.8 15.748,51.308 17.272,51.308 17.855,51.891 IC2.9
NetIC2_10: IC2.10 JMP2.2 | length 12.3
  Top Layer w0.254: JMP2.2 17.78,47.244 18.338,47.802 IC2.10
NetIC2_11: IC2.11 JMP3.2 | length 15.1
  Top Layer w0.254: IC2.11 18.846,52.02 19.558,51.308 21.082,51.308 21.844,50.546 21.844,48.006 21.082,47.244 JMP3.2
NetIC2_12: IC2.12 IC2.14 R20.1 | length 15.9
  Top Layer w0.254: IC2.12 19.354,54.814 20.066,54.102 23.622,54.102 24.13,54.61 R20.1 24.13,56.642 23.876,56.896 20.828,56.896 20.345,57.379 IC2.14
NetIC2_13: IC2.13 R5.2 | length 3.7
  Top Layer w0.254: IC2.13 19.837,56.871 21.031,55.677 R5.2
NetIC2_17: IC2.17 RP1.2 | length 2.7
  Top Layer w0.254: IC2.17 23.854,60.176 RP1.2
NetIC2_21: IC2.21 J4.2 | length 14.8
  Top Layer w0.305: IC2.21 21.797,62.183 22.098,62.484 v1(22.098,63.246)
  Bottom Layer w0.305: J4.2 15.454,70.144 16.51,69.088 20.574,69.088 22.098,67.564 v1(22.098,63.246)
NetIC2_23: IC2.23 R26.1 | length 6.7
  Top Layer w0.254: IC2.23 19.837,65.303 20.806,66.272 R26.1
NetIC2_24: IC2.24 J4.1 | length 8.7
  Top Layer w0.305: J4.1 17.954,70.184 19.354,68.784 IC2.24
NetIC2_26: IC2.26 J4.3 | length 13.3
  Top Layer w0.254: J4.3@12.446,71.12 J4.3@12.75,70.816 ; J4.3 12.954,69.85 13.208,69.596 17.526,69.596 18.338,68.784 IC2.26
NetIC2_27: IC2.27 R25.1 | length 4.3
  Top Layer w0.254: R25.1 17.272,65.786 17.855,65.203 IC2.27
NetIC3_2: IC3.2 Q1.1 | length 5.3
  Top Layer w0.254: Q1.1 64.958,35.88 66.04,34.798 66.04,34.036 66.294,33.782 IC3.2
NetIC3_4: IC3.4 R27.2 R28.2 | length 9.2
  Top Layer w0.254: R27.2 61.722,30.457 61.722,31.75 61.976,32.004 63.804,32.004 ; R28.2 63.804,32.004 ; IC3.4 65.532,31.242 64.77,32.004 63.804,32.004
NetIC5_3: IC5.3 RP2.2 | length 4.2
  Top Layer w0.508: RP2.2 34.014,58.906 IC5.3
NetIC7_4: IC7.4 R14.2 R29.2 | length 11.1
  Top Layer w0.381: R29.2 R14.2 14.986,30.988 13.716,29.718 13.716,26.67 14.126,26.26 IC7.4
NetIC8_4: IC8.4 R12.2 R30.2 | length 13.1
  Top Layer w1.016: R30.2 R12.2 40.386,32.461 40.386,27.178 41.708,25.856 IC8.4
NetIC8_5: IC8.5 R10.2 | length 6.3
  Top Layer w1.016: R10.2 42.418,32.004 44.447,29.975 IC8.5
NetJ5_1: J5.1 R17.1 | length 19.4
  Top Layer w0.229: R17.1 77.216,21.336 80.772,17.78 80.772,12.192 81.2,11.764 J5.1
NetJ5_2: J5.2 R16.1 | length 18.3
  Top Layer w0.229: R16.1 75.946,23.876 81.534,18.288 81.534,14.732 82.002,14.264 J5.2
NetJ6_3: J6.3 R15.2 | length 4.5
  Top Layer w0.254: R15.2 54.609,6.507 J6.3
NetJ7_2: J7.2 Q2.3 R6.2 | length 11.8
  Top Layer w0.254: R6.2 53.656,53.199 Q2.3 56.896,48.26 57.404,47.752 J7.2
NetJ8_2: J8.2 Q3.3 R8.2 | length 13.2
  Top Layer w0.229: R8.2 81.839,37.389 Q3.3 82.804,37.084 83.566,36.322 83.566,31.75 84.328,30.988 J8.2
NetJ8_3: J8.3 Q4.3 R21.2 | length 18
  Top Layer w0.254: R21.2 81.534,30.758 81.534,27.178 81.788,26.924 87.376,26.924 87.884,27.432 87.884,32.766 87.162,33.488 J8.3
NetR4_1: R4.1 RP1.3 | length 2.5
  Top Layer w0.254: RP1.3 27.498,61.57 R4.1
RST1: IC1.29 J12.5 | length 66.8
  Top Layer w0.305: J12.5 28.916,69.128 30.48,67.564 46.99,67.564 49.276,65.278 49.276,59.436 52.07,56.642 63.754,56.642 v1(64.262,56.134) ; v1(80.518,54.102) IC1.29
  Bottom Layer w0.305: v1(64.262,56.134) 66.294,54.102 v1(80.518,54.102)
RST2: IC1.24 J13.5 | length 50.7
  Top Layer w0.254: J13.5 50.118,68.5 51.816,66.802 v1(60.96,66.802) ; IC1.24 80.772,47.539 v1(80.772,51.054)
  Bottom Layer w0.254: v1(60.96,66.802) 61.976,66.802 63.5,65.278 63.5,53.848 66.294,51.054 v1(80.772,51.054)
RX0: IC1.34 J14.1 | length 12.2
  Top Layer w0.254: IC1.34 85.598,60.452 86.106,59.944 86.106,53.848 87.884,52.07 J14.1
RX2: IC1.27 Q4.2 R13.1 | length 43.7
  Top Layer w0.254: R13.1 81.777,25.411 80.185,27.003 Q4.2 76.375,27.003 75.692,27.686 75.692,40.64 77.47,42.418 86.36,42.418 87.122,43.18 87.122,50.8 86.36,51.562 IC1.27
SCK: IC1.30 J12.4 J13.4 | length 68.5
  Top Layer w0.305: v1(80.772,55.372) IC1.30
  Bottom Layer w0.305: J12.4 31.416,68.66 32.258,67.818 51.896,67.818 52.618,68.54 ; J13.4 52.618,68.54 ; v1(80.772,55.372) 66.04,55.372 64.008,57.404 64.008,65.532 61.976,67.564 53.594,67.564 52.618,68.54
SS1: IC1.18 J12.6 | length 81.5
  Top Layer w0.305: v1(27.178,41.402) 27.686,40.894 70.866,40.894 73.135,43.163 IC1.18
  Bottom Layer w0.305: J12.6 27.178,70.358 v1(27.178,41.402)
SS2: IC1.23 J13.6 | length 52
  Top Layer w0.254: J13.6 47.618,68.206 49.784,66.04 v1(60.96,66.04) ; v1(79.248,50.292) 79.485,50.055 IC1.23
  Bottom Layer w0.254: v1(60.96,66.04) 61.976,66.04 62.992,65.024 62.992,52.832 65.532,50.292 v1(79.248,50.292)
TX0: IC1.35 J14.2 | length 11.2
  Top Layer w0.254: IC1.35 85.852,61.722 86.868,60.706 86.868,55.372 87.63,54.61 J14.2
TX2: IC1.28 Q3.2 R9.1 | length 35.6
  Top Layer w0.229: R9.1 81.839,34.493 80.198,36.134 Q3.2 77.912,36.134 76.2,37.846 76.2,40.386 77.724,41.91 87.122,41.91 87.884,42.672 87.884,51.054 86.106,52.832 IC1.28
VS: C8.2 C13.2 IC5.6 JMP4.2 | length 15.4
  Top Layer w0.254: JMP4.2 38.967,53.848 ; C8.2 38.967,53.848 ; IC5.6 39.602,58.906 39.116,58.42 39.116,55.521 C13.2 38.967,53.848
pads on no net: IC1.4 IC1.5 IC1.17 IC1.19 IC1.20 IC1.21 IC1.22 IC1.32 IC2.7 IC2.20 IC2.25 IC3.9 IC3.10 IC3.13

## Polygon pours and split planes (outlines as drawn)
GND on Bottom Layer "Bottom Layer-GND" (solid, remove dead copper, pour order 4): -0.127,0 -0.127,77 cw(c0,77) 0,77.127 65.532,77.127 cw(c65.532,77) 65.659,77 cw(c65.532,77) 65.582,76.883 65.582,66.344 92.906,66.344 cw(c93,66.258) 93.127,66.258 93.127,0 cw(c93,0) 93,-0.127 0,-0.127 cw(c0,0)
GND on Bottom Layer "Bottom-GND" (solid, shelved, pour order 0): 1.27,1.27 1.27,75.692 91.44,75.692 91.694,75.692 91.694,1.27 1.27,1.27
GND on Top Layer "Top Layer-GND" (solid, remove dead copper, pour order 2): -0.127,0 -0.127,77 cw(c0,77) 0,77.127 65.532,77.127 cw(c65.532,77) 65.659,77 cw(c65.532,77) 65.582,76.883 65.582,66.344 92.906,66.344 cw(c93,66.258) 93.127,66.258 93.127,0 cw(c93,0) 93,-0.127 0,-0.127 cw(c0,0)

## Silkscreen, mask and mechanical layers (free items; w line width, h text height)
Top Overlay:
  text "Stepper motor" at 9.906,74.93 h1.52
  text "Container RFID" at 26.162,74.93 h1.52
  text "Tray RFID" at 49.784,74.93 h1.52
  text "Battery balancing" at 2.794,55.88 h1.52 r90
  text "Programmer" at 91.948,53.086 h1.52 r90
  text "BMS balancing" at 2.794,42.164 h1.52 r90
  text "Speaker" at 33.02,41.402 h1.52
  text "RGB LED" at 55.626,39.878 h1.52
  text "Battery input" at 2.54,31.242 h1.52 r90
  text "Nextion screen" at 90.932,28.194 h1.52 r90
  text "Weight sensor" at 91.694,11.176 h1.52 r90
  text "BMS output" at 12.192,1.27 h1.52
  text "Charger input" at 23.368,1.27 h1.52
  text "Solenoid" at 38.862,1.27 h1.52
  text "End stop" at 50.546,1.27 h1.52
  text "Microphone" at 65.532,1.27 h1.52
Mechanical 1:
  the board outline again, w0.1

## Text inside footprints (layer, text, board x,y; h text height)
CE1: Top Overlay "+" at 14.744,16.061 h0.76
CE2: Top Overlay "+" at 29.016,36.914 h0.76
CE3: Top Overlay "+" at 42.938,15.807 h0.76
CE4: Top Overlay "+" at 53.146,36.152 h0.76